# Altium PCB Fast_Servo.PCBDOC (part 9 of 11)
Units mm, origin at the board's own origin, x right, y up, seen from the top; angles counter-clockwise.
Board outline 162.48 x 100 mm, 6 copper layers (Top, GP1(GND), L3, L4, P3V3, Bot), stack 1.716 mm thick; 668 components, 491 nets, 2308 pads, 1133 vias.
Unrouted connection lines stored in the file: 2.
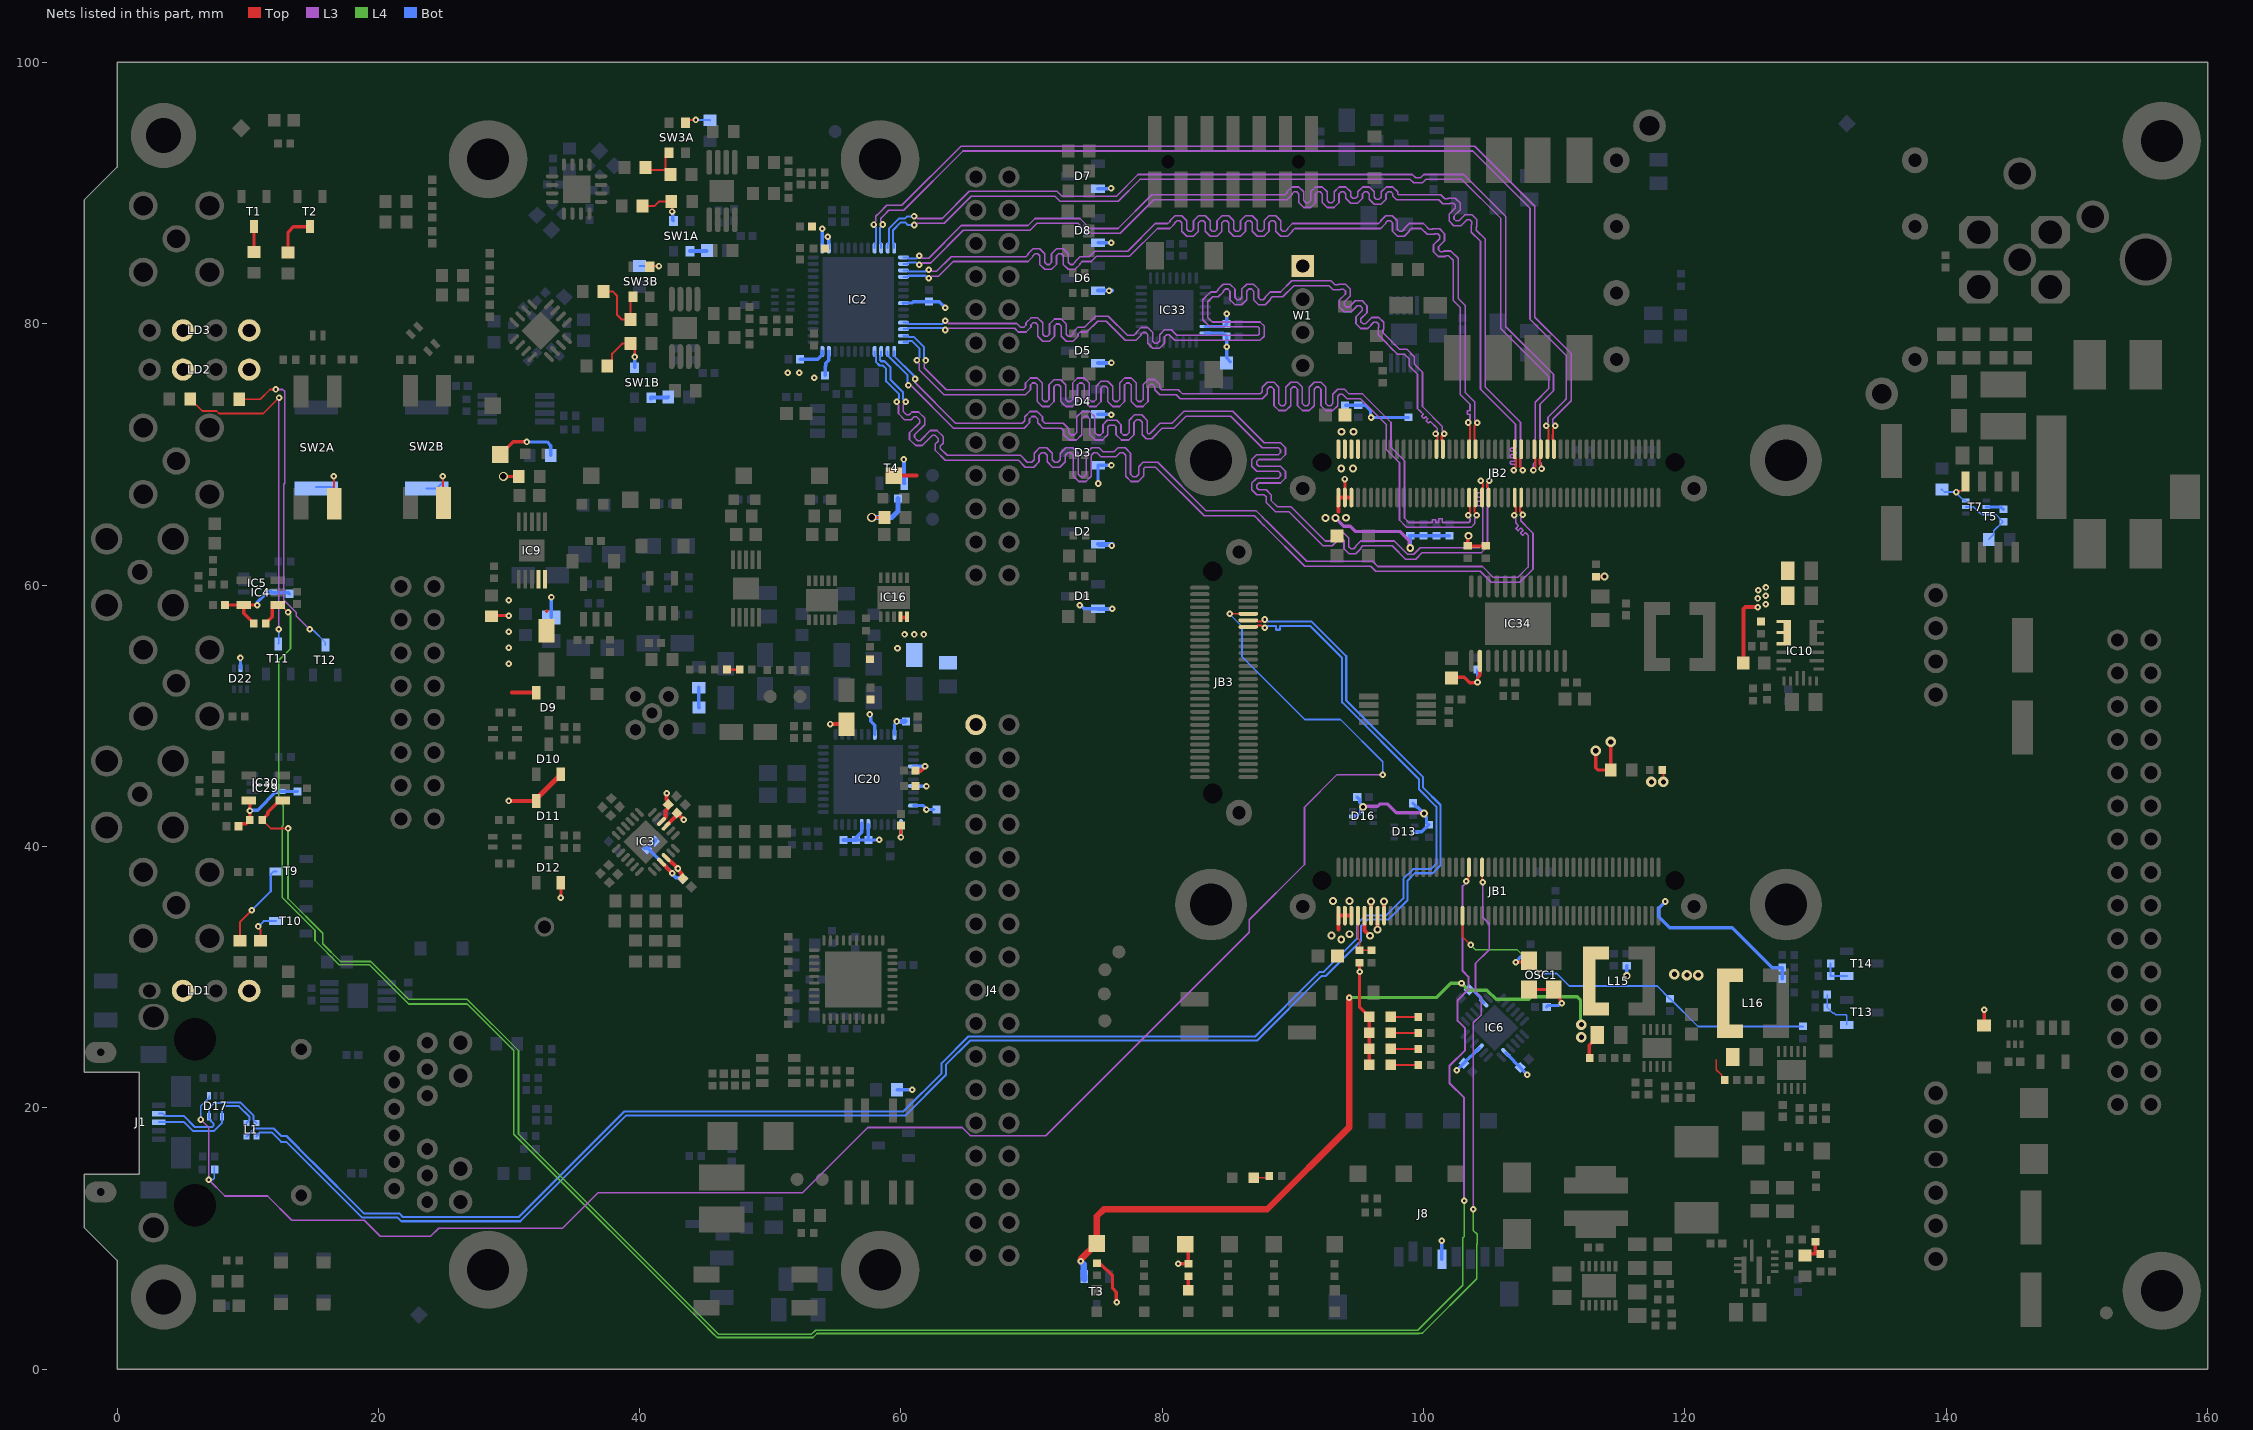
[diagram p11: the nets of this part, all layers, seen from the top]

## Via types
v1: diameter 0.5, hole 0.2, Top to Bot, tented both sides, 1045 vias
v2: diameter 0.8, hole 0.4, Top to Bot, tented both sides, 40 vias
v3: diameter 0.6, hole 0.3, Top to Bot, tented both sides, 27 vias
v4: diameter 1.27, hole 0.711, Top to Bot, tented both sides, 11 vias
v5: diameter 0.7, hole 0.5, Top to Bot, tented both sides, 10 vias

## Nets (pads, with @x,y where several pads share a name; then routed paths per layer and width w, separated by ;. In a path a pad name is that pad's centre, name@x,y a point inside that pad or via, vN(x,y) a via of type N, cw(c..) or ccw(c..) an arc to the next point about the centre after c; other vN are vias at no path point) (continued)
NetLD15_2: LD15.2 R115.2 | length 1.1
  Top w0.25: LD15.2@81.994,6.024 R115.2@81.994,7.122
NetLD16_1: LD16.1 R158.1 | length 2.1
  Top w0.125: LD16.1@97.49,23.276 R158.1@99.595,23.276
NetLD17_1: LD17.1 R159.1 | length 2.1
  Top w0.125: LD17.1@97.494,24.5 R159.1@99.591,24.5
NetLD18_1: LD18.1 R161.1 | length 2.1
  Top w0.125: LD18.1@97.498,25.724 R161.1@99.587,25.724
NetLD19_1: LD19.1 R162.1 | length 2.1
  Top w0.125: LD19.1@97.503,26.948 R162.1@99.582,26.948
NetLD20_2: LD20.2 R133.2 | length 1.2
  Top w0.125: LD20.2@87.007,14.656 88.062,14.656 R133.2@88.189,14.783
NetOSC1_3: OSC1.3 R160.1 | length 2.4
  Top w0.254: v1(107.041,31.152) 107.966,31.152 OSC1.3@108.07,31.256
  Bot w0.254: v1(107.041,31.152) 107.476,31.587 R160.1@108.175,31.587
NetR40A_2: R40A.2 SW1A.1 | length 1.3
  Bot w0.3: SW1A.1@43.862,85.567 R40A.2@45.12,85.567
NetR40B_2: R40B.2 SW1B.1 | length 1.4
  Bot w0.3: SW1B.1@40.884,74.297 SW1B.1@40.884,74.347 42.142,74.347 R40B.2@42.186,74.391
NetR45A_2: R45A.2 R46A.1 SW1A.3 | length 3.9
  Top w0.16: R45A.2@40.223,89.025 41.148,89.025 41.498,89.375 R46A.1@42.424,89.375 42.479,89.319 v1(42.479,88.591)
  Bot w0.25: v1(42.479,88.591) 42.527,88.544 42.527,87.932 SW1A.3@42.592,87.867
NetR45B_2: R45B.2 R46B.1 SW1B.3 | length 4.8
  Top w0.16: R45B.2@37.527,76.777 37.897,77.147 37.897,77.717 38.66,78.48 R46B.1@39.3,78.48 39.627,78.153 v1(39.627,77.463)
  Bot w0.25: SW1B.3@39.614,76.647 39.621,76.653 39.621,77.457 v1(39.627,77.463)
NetR50A_2: R50A.2 R51A.1 SW3A.3 | length 4.1
  Top w0.16: R50A.2@40.45,91.975 40.669,91.756 R51A.1@42.019,91.756 ; SW3A.3@42.239,93.075 41.993,92.829 41.993,91.782 R51A.1@42.019,91.756 ; R51A.1@42.019,91.756 R51A.1@42.363,91.412 R51A.1@42.019,91.756
NetR50B_2: R50B.2 R51B.1 SW3B.3 | length 5.6
  Top w0.16: R50B.2@37.24,82.48 37.93,82.48 38.27,82.14 38.27,80.68 38.61,80.34 R51B.1@39.3,80.34 39.3,81.86 SW3B.3@39.504,82.064
NetR54A_2: R54A.2 SW2A.4 | length 4.3
  Top w0.16: v1(16.6,68.32) 16.6,66.257 SW2A.4@16.626,66.231
  Bot w0.152: R54A.2@15.245,67.5 16.6,67.5 v1(16.6,68.32)
NetR54B_2: R54B.2 SW2B.4 | length 3.9
  Top w0.16: v1(24.931,68.32) 24.951,68.3 SW2B.4@24.951,66.34
  Bot w0.152: R54B.2@23.7,67.4 24.476,67.4 24.931,67.855 v1(24.931,68.32)
NetR58A_2: R58A.2 SW3A.1 | length 2
  Top w0.16: SW3A.1@43.509,95.375 43.734,95.6 v1(44.288,95.6)
  Bot w0.16: v1(44.288,95.6) 45.349,95.6 R58A.2@45.374,95.575
NetR58B_2: R58B.2 SW3B.1 | length 2.2
  Top w0.16: SW3B.1@40.774,84.364 40.829,84.42 v1(41.477,84.42)
  Bot w0.16: R58B.2@40,84.42 v1(41.477,84.42)
NetR96_2: R96.2 T9.3 | length 6.6
  Top w0.16: R96.2@9.425,32.775 9.425,34.225 v1(10.325,35.125)
  Bot w0.16: v1(10.325,35.125) 11.765,36.565 11.765,37.872 11.985,38.092 T9.3@12.185,38.092
NetR97_2: R97.2 T10.3 | length 2.7
  Top w0.16: v1(10.81,33.875) 10.81,33.783 10.97,33.623 R97.2@10.97,32.775
  Bot w0.16: v1(10.81,33.875) 11.219,34.284 T10.3@12.15,34.284
NetR98_2: R98.2 T11.3 | length 26.7
  Top w0.125: R98.2@5.6,74.261 5.6,74.211 5.987,73.824 6.037,73.824 6.532,73.33 7.614,73.33 7.804,73.14 11.19,73.14 v1(12.4,74.35)
  L3 w0.125: v1(12.378,56.618) 12.378,74.328 v1(12.4,74.35)
  Bot w0.125: T11.3@12.346,55.503 12.378,55.535 v1(12.378,56.618)
NetR99_2: R99.2 T12.3 | length 24.7
  Top w0.125: R99.2@9.35,74.225 10.97,74.225 11.713,74.968 12.143,74.968 v1(12.15,74.975)
  L3 w0.125: v1(12.15,74.975) 12.689,74.975 12.838,74.827 12.838,67.788 12.762,67.713 12.762,58.862 13.714,57.91 13.714,57.642 v1(14.737,56.618)
  Bot w0.125: v1(14.737,56.618) 14.809,56.547 15.016,56.547 15.95,55.612 T12.3@15.95,55.412
NetR101_2: R101.2 T1.3 | length 1.9
  Top w0.25: T1.3@10.488,87.431 10.488,85.509 R101.2@10.498,85.499
NetR103_2: R103.2 T2.3 | length 3.4
  Top w0.25: R103.2@13.091,85.455 13.091,87.022 13.499,87.431 T2.3@14.775,87.431
NetR123_1: R123.1 R192.2 T13.1 | length 3.4
  Bot w0.125: R192.2@130.904,28.658 R123.1@130.904,27.689 130.904,27.669 131.352,27.221 131.445,27.221 131.548,27.118 132.312,27.118 132.385,27.044 T13.1@132.385,26.343
NetR124_1: R124.1 R211.2 T14.1 | length 2.2
  Bot w0.152: R211.2@131.155,31.031 R124.1@131.155,30.081 T14.1@132.385,30.081
NetR141_2: R141.2 R207.1 R208.2 | length 2.2
  Top w0.25: R208.2@129.179,8.7 129.316,8.837 129.982,8.837 ; R207.1@130.007,9.755 129.982,9.73 129.982,8.837 ; R141.2@130.345,8.817 130.325,8.837 129.982,8.837
NetR151_1: R151.1 T7.2 | length 1.4
  Bot w0.25: T7.2@143.065,65.975 144.167,65.975 144.347,65.795 R151.1@144.367,65.795
NetR151_2: R151.2 R154.2 T7.3 T7.5 | length 5.2
  Bot w0.127: T7.5@141.485,65.975 142.095,65.975 142.59,65.48 143.06,65.48 T7.3@143.065,65.475 143.727,65.475 R151.2@144.347,64.855 ; R154.2@143.257,63.5 143.643,63.887 143.643,64.151 R151.2@144.347,64.855 ; R151.2@144.367,64.855 R151.2@144.347,64.855
NetR153_2: R153.2 T5.4 T7.6 | length 3.6
  Top w0.127: v1(140.75,67.125) 140.851,67.125 140.939,67.214 141.229,67.214 141.465,67.45 T5.4@141.465,67.925
  Bot w0.127: R153.2@139.622,67.32 R153.2@139.672,67.32 139.867,67.125 v1(140.75,67.125) 140.75,67.075 141.35,66.475 T7.6@141.485,66.475
NetR171_2: R171.2 R191.1 | length 1.5
  Bot w0.3: R171.2@44.52,52.153 44.52,50.653 R191.1@44.532,50.642
NetR213_2: R213.2 R214.1 | length 1
  Top w0.2: R213.2@46.682,53.527 R214.1@47.647,53.527
NOSEQ: JB1.8 R155.1 R156.2 | length 3.6
  Top w0.125: JB1.8@94.975,34.704 94.975,32.977 95.1,32.851 R155.1@95.1,32.042 96.013,32.042 R156.2@96.02,32.049
OEn_DO0: IC29.1 JB1.41 R90.1 | length 153.4
  Top w0.127: R90.1@11.115,42.025 11.115,42.005 11.341,41.779 11.361,41.779 11.765,41.375 v1(13.09,41.375)
  Top w0.16: v1(103.276,37.345) 103.276,37.393 103.448,37.565 103.448,38.377 JB1.41@103.475,38.404
  Top w0.254: R90.1@11.115,42.025 11.115,42.045 11.546,42.476 11.546,42.621 12.445,43.52 IC29.1@12.695,43.52
  L3 w0.16: v1(103.1,12.875) 103.1,20.765 101.969,21.896 101.969,23.194 103.175,24.4 103.175,26.075 102.6,26.65 102.6,28.227 103.423,29.05 103.423,30.027 102.982,30.468 102.982,36.959 103.276,37.253 v1(103.276,37.345)
  L4 w0.127: v1(13.09,41.375) 13.09,36.01 15.75,33.35 15.75,32.55 17.1,31.2 19.425,31.2 22.31,28.315 26.791,28.315 30.729,24.377 30.729,17.971 46.036,2.664 53.158,2.664 53.472,2.978 99.553,2.978 103,6.425 103,10.05 103.1,10.15 v1(103.1,12.875)
OEn_DO1: IC4.1 JB1.45 R84.1 | length 169.6
  Top w0.125: IC4.1@12.298,58.475 12.548,58.475 13.09,57.933 v1(13.09,57.916) ; JB1.45@104.475,38.404 104.5,38.379 104.5,37.275 v1(104.525,37.25)
  Top w0.254: R84.1@11.395,57.075 11.395,57.095 11.875,57.575 11.875,58.302 12.048,58.475 IC4.1@12.298,58.475
  L3 w0.125: v1(103.805,12.226) 103.805,26.498 104.4,27.093 104.4,28.435 103.975,28.86 103.975,31.05 105.025,32.1 105.025,34.075 104.525,34.575 v1(104.525,37.25)
  L4 w0.125: v1(13.09,57.916) 13.275,57.731 13.275,55.137 12.378,54.24 12.378,43.475 12.736,43.117 12.736,41.639 12.653,41.556 12.653,36.093 15.15,33.595 15.15,32.795 16.996,30.949 19.321,30.949 22.327,27.943 26.808,27.943 30.375,24.376 30.375,17.97 45.037,3.308 45.367,2.978 45.6,2.746 45.932,2.413 53.262,2.413 53.576,2.727 99.648,2.727 ccw(c99.648,2.852) 99.666,2.728 99.914,2.764 104.075,6.925 104.075,9.575 104.096,9.596 104.096,10.318 103.805,10.608 v1(103.805,12.226)
OTG-D_L_N: D17.6 J1.2 L1.4 | length 10.8
  Bot w0.152: J1.2@3.2,19.546 3.525,19.546 3.694,19.376 5.101,19.376 5.931,18.546 7.306,18.546 7.395,18.635 7.395,18.761 7.198,18.958 7.198,19.045 7.051,19.192 7.051,20.013 7.392,20.354 7.95,20.354 8.015,20.419 9.446,20.419 10.441,19.424 10.441,19.069 L1.4@10.665,18.845
OTG-D_L_P: D17.4 J1.3 L1.1 | length 9.6
  Bot w0.152: J1.3@3.2,18.895 5.141,18.895 5.802,18.234 7.435,18.234 8.051,18.85 8.051,20.028 8.14,20.117 9.32,20.117 10.139,19.298 10.139,19.069 L1.1@9.915,18.845
OTG-D_N: JB3.50 L1.3 | length 134.6
  Top w0.16: JB3.50@86.575,57.305 87.212,57.305 87.302,57.215 87.594,57.215 87.748,57.368 v1(87.84,57.368)
  Bot w0.16: L1.3@10.665,17.795 10.81,17.94 10.81,18.002 10.904,18.095 11.869,18.095 12.573,17.391 12.963,17.391 14.784,15.57 14.791,15.57 18.765,11.596 21.478,11.596 21.76,11.314 30.864,11.314 38.946,19.396 60.319,19.396 63.432,22.508 63.432,23.285 65.282,25.135 87.25,25.135 92.179,30.064 92.179,30.078 92.493,30.078 95.214,32.8 95.214,33.916 95.702,34.404 97.284,34.404 98.77,35.89 98.77,37.387 99.33,37.947 100.69,37.947 101.295,38.552 101.295,43.173 99.965,44.503 99.965,45.285 94.081,51.169 94.081,54.556 91.432,57.204 v1@87.848,57.204
OTG-D_P: JB3.48 L1.2 | length 134.6
  Top w0.16: JB3.48@86.575,56.805 87.212,56.805 87.302,56.895 87.594,56.895
  Bot w0.16: L1.2@9.915,17.795 10.535,18.415 12.001,18.415 12.577,17.839 12.967,17.839 14.916,15.89 14.924,15.89 18.897,11.916 21.61,11.916 21.893,11.634 30.731,11.634 38.813,19.716 60.187,19.716 63.112,22.641 63.112,23.418 65.149,25.455 87.117,25.455 91.834,30.172 91.834,30.186 92.046,30.398 92.36,30.398 94.894,32.932 94.894,34.049 95.57,34.724 97.152,34.724 98.45,36.022 98.45,37.52 99.198,38.267 100.557,38.267 100.975,38.685 100.975,43.04 99.645,44.37 99.645,45.153 93.761,51.036 93.761,54.423 91.3,56.884 89.15,56.884 89.064,56.884 ccw(c89.064,56.836) 89.016,56.836 89.016,56.632 cw(c88.968,56.632) 88.968,56.584 88.744,56.584 cw(c88.744,56.632) 88.696,56.632 88.696,56.836 ccw(c88.648,56.836) 88.648,56.884 88.376,56.884 88.216,56.884 v1@87.848,56.884
  other v1: 87.84,56.741
OTG-ID: D17.1 JB3.52 R4.1 | length 138.4
  Top w0.125: v1(85.177,57.8) 85.179,57.802 86.572,57.802 JB3.52@86.575,57.805 JB3.52@86.598,57.828
  L3 w0.125: v1(6.412,19.101) 7.028,18.485 v1(7.028,14.487) 8.27,13.246 11.515,13.246 13.375,11.386 18.916,11.386 20.141,10.16 23.988,10.16 24.615,10.787 34.101,10.787 36.808,13.495 52.467,13.495 57.459,18.487 64.687,18.487 65.321,17.853 71.087,17.853 86.662,33.428 86.662,34.397 90.88,38.615 90.88,43.006 93.375,45.5 v1(96.869,45.5)
  Bot w0.125: v1(6.412,19.101) 6.412,20.133 7.051,20.772 D17.1@7.051,20.907 ; v1(7.028,14.487) 7.324,14.487 7.445,14.608 R4.1@7.445,15.5 ; v1@85.143,57.785 86.097,56.832 86.097,54.519 90.9,49.716 93.631,49.716 96.869,46.479 v1(96.869,45.5)
OUT1A_N: IC2.43 JB2.56 | length 78.5
  Top w0.16: v1(106.923,65.355) 106.923,65.45 107.069,65.595 107.069,65.97 106.975,66.064 JB2.56@106.975,66.704
  L3 w0.125: v1(60.375,74.025) 60.375,73.991 60.184,73.799 60.184,73.285 60.427,73.041 60.626,73.041 60.838,73.253 61.347,73.253 61.81,72.79 61.81,72.281 61.032,71.503 61.032,71.305 61.276,71.061 61.474,71.061 62.252,71.839 62.761,71.839 63.224,71.376 63.224,70.867 63.012,70.655 63.012,70.456 63.538,69.93 69.148,69.93 69.675,69.404 70.002,69.404 70.193,69.594 70.193,70.094 70.602,70.504 71.158,70.504 71.568,70.094 71.568,69.594 71.758,69.404 72.002,69.404 72.193,69.594 72.193,70.094 72.602,70.504 73.158,70.504 73.568,70.094 73.568,68.494 73.758,68.304 74.002,68.304 74.193,68.494 74.193,70.094 74.602,70.504 75.158,70.504 75.458,70.204 76.302,70.204 76.602,70.504 77.158,70.504 77.568,70.094 77.568,68.494 77.758,68.304 78.002,68.304 78.193,68.494 78.193,69.07 78.527,69.404 79.642,69.404 83.368,65.679 87.204,65.679 87.674,65.209 87.674,65.193 87.93,64.937 87.946,64.937 91.06,61.823 96.104,61.823 96.497,61.43 104.5,61.43 105.339,60.591 107.206,60.591 107.995,61.38 107.995,63.817 107.883,63.929 107.821,63.991 ccw(c107.795,63.964) 107.768,63.991 107.609,63.832 cw(c107.582,63.858) 107.556,63.832 107.432,63.955 cw(c107.459,63.982) 107.432,64.008 107.591,64.167 ccw(c107.565,64.194) 107.591,64.22 107.468,64.344 ccw(c107.441,64.318) 107.415,64.344 107.255,64.185 cw(c107.229,64.212) 107.202,64.185 107.079,64.309 cw(c107.105,64.335) 107.079,64.362 107.243,64.527 ccw(c107.223,64.548) 107.243,64.568 107.049,64.763 107.049,65.229 v1(106.923,65.355)
  Bot w0.16: IC2.43@58.484,77.888 58.484,77.576 58.394,77.486 58.394,77.227 58.488,77.133 58.74,77.133 59.184,76.689 59.184,75.739 60.156,74.766 60.156,74.27 60.375,74.051 v1(60.375,74.025)
OUT1A_P: IC2.44 JB2.58 | length 78.7
  Top w0.16: JB2.58@107.475,66.704 107.475,66.064 107.381,65.97 107.381,65.675 107.6,65.456 v1(107.6,65.375)
  L3 w0.125: v1(59.684,74.026) 59.684,73.924 59.809,73.799 59.809,73.129 60.272,72.666 60.781,72.666 60.993,72.878 61.191,72.878 61.435,72.634 61.435,72.436 60.657,71.658 60.657,71.149 61.121,70.686 61.629,70.686 62.407,71.464 62.605,71.464 62.849,71.22 62.849,71.022 62.637,70.81 62.637,70.301 63.383,69.555 68.993,69.555 69.52,69.029 70.158,69.029 70.568,69.439 70.568,69.939 70.758,70.129 71.002,70.129 71.193,69.939 71.193,69.439 71.602,69.029 72.158,69.029 72.568,69.439 72.568,69.939 72.758,70.129 73.002,70.129 73.193,69.939 73.193,68.339 73.602,67.929 74.158,67.929 74.568,68.339 74.568,69.939 74.758,70.129 75.002,70.129 75.302,69.829 76.458,69.829 76.758,70.129 77.002,70.129 77.193,69.939 77.193,68.339 77.602,67.929 78.158,67.929 78.568,68.339 78.568,68.914 78.682,69.029 79.487,69.029 83.212,65.304 87.049,65.304 87.299,65.054 87.299,65.038 87.775,64.562 87.79,64.562 90.905,61.448 95.949,61.448 96.342,61.055 104.344,61.055 105.183,60.216 107.361,60.216 108.37,61.225 108.37,63.972 108.148,64.194 107.424,64.918 107.424,65.128 107.6,65.304 v1(107.6,65.375)
  Bot w0.16: IC2.44@57.984,77.888 57.984,77.576 58.074,77.486 58.074,77.094 58.355,76.813 58.607,76.813 58.864,76.557 58.864,75.606 59.836,74.634 59.836,74.27 59.684,74.118 v1(59.684,74.026)
OUT1B_N: IC2.41 JB2.46 | length 80.9
  Top w0.16: v1(104.38,67.978) 104.38,67.886 104.54,67.726 104.54,67.468 104.502,67.429 104.502,66.731 JB2.46@104.475,66.704
  L3 w0.125: v1(61.075,75.775) 61.075,75.667 61.087,75.654 61.087,75.478 64.18,72.385 69.271,72.385 69.461,72.575 69.461,72.875 69.871,73.285 70.427,73.285 70.836,72.875 70.836,72.575 71.027,72.385 72.427,72.385 72.836,71.975 72.836,71.675 73.027,71.485 73.271,71.485 73.461,71.675 73.461,72.875 73.871,73.285 74.427,73.285 74.836,72.875 74.836,71.675 75.027,71.485 75.271,71.485 75.461,71.675 75.461,72.275 75.794,72.608 76.504,72.608 76.837,72.275 76.837,71.675 77.027,71.485 77.271,71.485 77.461,71.675 77.461,72.63 77.871,73.04 78.427,73.04 78.837,72.63 78.837,71.675 78.926,71.586 79.03,71.586 79.829,72.385 80.74,72.385 81.66,73.305 85.391,73.305 87.806,70.89 89.045,70.89 89.425,70.51 89.425,69.995 89.045,69.615 87.385,69.615 87.225,69.455 87.225,69.25 87.385,69.09 89.045,69.09 89.425,68.71 89.425,68.195 89.045,67.815 87.385,67.815 87.225,67.655 87.225,67.45 87.385,67.29 87.945,67.29 88.325,66.91 88.325,66.48 88.813,65.992 89.847,65.992 92.46,63.38 92.846,63.38 93.006,63.54 93.006,63.6 93.386,63.98 93.902,63.98 94.281,63.6 94.281,62.94 94.442,62.78 94.646,62.78 94.806,62.94 94.806,63 95.186,63.38 97.756,63.38 98.773,62.362 99.243,62.362 99.747,62.866 104.281,62.866 104.515,63.1 104.515,65.893 104.515,65.925 104.515,65.99 104.418,66.088 104.148,66.088 104.051,66.185 104.051,66.315 104.148,66.413 104.418,66.413 104.515,66.51 104.515,66.64 104.418,66.738 104.148,66.738 104.051,66.835 104.051,66.965 104.148,67.063 104.418,67.063 104.515,67.16 104.515,67.35 104.515,67.742 104.38,67.877 v1(104.38,67.978)
  Bot w0.16: IC2.41@59.484,77.888 59.484,77.576 59.46,77.552 60.967,76.045 60.967,75.883 v1(61.075,75.775)
OUT1B_P: IC2.42 JB2.48 | length 80.9
  Top w0.16: JB2.48@104.975,66.704 104.975,67.342 104.86,67.457 104.86,67.718 105.025,67.883 v1(105.025,67.975)
  L3 w0.125: v1(60.574,75.284) 60.645,75.213 60.822,75.213 64.024,72.01 69.427,72.01 69.836,72.42 69.836,72.72 70.027,72.91 70.271,72.91 70.461,72.72 70.461,72.42 70.871,72.01 72.271,72.01 72.461,71.82 72.461,71.52 72.871,71.11 73.427,71.11 73.836,71.52 73.836,72.72 74.027,72.91 74.271,72.91 74.461,72.72 74.461,71.52 74.871,71.11 75.427,71.11 75.836,71.52 75.836,72.12 75.949,72.233 76.349,72.233 76.461,72.12 76.461,71.52 76.871,71.11 77.427,71.11 77.837,71.52 77.837,72.474 78.027,72.665 78.271,72.665 78.462,72.474 78.462,71.52 78.771,71.211 79.185,71.211 79.984,72.01 80.896,72.01 81.816,72.93 85.236,72.93 87.651,70.515 88.4,70.515 88.89,70.515 89.05,70.355 89.05,70.15 88.89,69.99 87.23,69.99 86.85,69.61 86.85,69.095 87.23,68.715 88.89,68.715 89.05,68.555 89.05,68.35 88.89,68.19 87.23,68.19 86.85,67.81 86.85,67.295 87.23,66.915 87.79,66.915 87.95,66.755 87.95,66.325 88.658,65.617 89.692,65.617 89.714,65.595 92.305,63.005 93.002,63.004 93.381,63.384 93.381,63.444 93.542,63.604 93.746,63.604 93.906,63.444 93.906,62.784 94.286,62.405 94.802,62.405 95.181,62.784 95.181,62.844 95.342,63.004 97.601,63.005 98.618,61.987 99.398,61.987 99.902,62.491 104.436,62.491 104.89,62.945 104.89,65.893 104.89,67.739 105.025,67.874 v1(105.025,67.975)
  Bot w0.16: IC2.42@58.984,77.888 58.984,77.576 60.509,76.051 60.509,75.349 v1(60.574,75.284)
OUT1C_N: IC2.39 JB2.42 | length 81
  Top w0.16: v1(103.423,65.355) 103.423,65.447 103.565,65.589 103.565,65.976 103.475,66.066 JB2.42@103.475,66.704
  L3 w0.125: v1(61.902,77.194) 61.902,77.093 61.777,76.968 61.777,76.626 63.454,74.949 69.374,74.949 69.534,75.109 69.534,75.469 69.914,75.849 70.429,75.849 70.809,75.469 70.809,74.209 70.969,74.049 71.174,74.049 71.334,74.209 71.334,75.34 71.714,75.719 72.229,75.719 72.609,75.34 72.609,74.209 72.769,74.049 72.974,74.049 73.134,74.209 73.134,75.469 73.514,75.849 74.029,75.849 74.409,75.469 74.409,74.209 74.569,74.049 74.774,74.049 74.934,74.209 74.934,75.214 75.314,75.593 75.829,75.593 76.209,75.214 76.209,74.209 76.369,74.049 76.574,74.049 76.734,74.209 76.734,75.469 77.114,75.849 77.629,75.849 78.009,75.469 78.009,74.209 78.169,74.049 78.374,74.049 78.534,74.209 78.534,75.355 78.914,75.735 79.429,75.735 79.809,75.355 79.809,75.109 79.969,74.949 81.226,74.949 81.54,74.635 87.488,74.635 87.648,74.795 87.648,75.155 88.028,75.535 88.543,75.535 88.923,75.155 88.923,73.895 89.083,73.735 89.288,73.735 89.448,73.895 89.448,75.155 89.828,75.535 90.343,75.535 90.723,75.155 90.723,73.895 90.883,73.735 91.088,73.735 91.248,73.895 91.248,75.155 91.628,75.535 92.143,75.535 92.523,75.155 92.523,73.895 92.683,73.735 92.888,73.735 93.048,73.895 93.048,74.607 93.428,74.987 93.943,74.987 94.295,74.635 95.317,74.635 97.504,72.448 97.504,70.542 98.532,69.514 98.532,65.132 98.872,64.793 100.543,64.793 100.63,64.793 ccw(c100.63,64.83) 100.668,64.83 100.668,64.962 cw(c100.705,64.962) 100.705,65 100.88,65 cw(c100.88,64.962) 100.918,64.962 100.918,64.83 ccw(c100.955,64.83) 100.955,64.793 101.13,64.793 ccw(c101.13,64.83) 101.168,64.83 101.168,65.055 cw(c101.205,65.055) 101.205,65.093 101.38,65.093 cw(c101.38,65.055) 101.418,65.055 101.418,64.83 ccw(c101.455,64.83) 101.455,64.793 101.668,64.793 101.739,64.793 103.476,64.793 103.549,64.866 103.549,65.128 103.423,65.254 v1(103.423,65.355)
  Bot w0.16: IC2.39@60.184,79.088 60.497,79.088 60.587,78.999 60.981,78.999 61.749,78.231 61.749,77.439 61.902,77.286 v1(61.902,77.194)
OUT1C_P: IC2.40 JB2.44 | length 80.9
  Top w0.16: JB2.44@103.975,66.704 103.975,66.066 103.885,65.976 103.885,65.613 104.05,65.447 v1(104.05,65.355)
  L3 w0.125: v1(61.225,77.2) 61.225,77.145 61.402,76.968 61.402,76.47 63.298,74.574 69.529,74.574 69.909,74.954 69.909,75.314 70.069,75.474 70.274,75.474 70.434,75.314 70.434,74.054 70.814,73.674 71.329,73.674 71.709,74.054 71.709,75.184 71.869,75.344 72.074,75.344 72.234,75.184 72.234,74.054 72.614,73.674 73.129,73.674 73.509,74.054 73.509,75.314 73.669,75.474 73.874,75.474 74.034,75.314 74.034,74.054 74.414,73.674 74.929,73.674 75.309,74.054 75.309,75.058 75.469,75.218 75.674,75.218 75.834,75.058 75.834,74.054 76.214,73.674 76.729,73.674 77.109,74.054 77.109,75.314 77.269,75.474 77.474,75.474 77.634,75.314 77.634,74.054 78.014,73.674 78.529,73.674 78.909,74.054 78.909,75.2 79.069,75.36 79.274,75.36 79.434,75.2 79.434,74.954 79.814,74.574 81.071,74.574 81.385,74.26 87.643,74.26 88.023,74.64 88.023,75 88.183,75.16 88.388,75.16 88.548,75 88.548,73.74 88.928,73.36 89.443,73.36 89.823,73.74 89.823,75 89.983,75.16 90.188,75.16 90.348,75 90.348,73.74 90.728,73.36 91.243,73.36 91.623,73.74 91.623,75 91.783,75.16 91.988,75.16 92.148,75 92.148,73.74 92.528,73.36 93.043,73.36 93.423,73.74 93.423,74.452 93.583,74.612 93.788,74.612 94.14,74.26 95.162,74.26 97.129,72.293 97.129,70.387 98.157,69.359 98.157,64.977 98.717,64.418 100.543,64.418 103.631,64.418 103.924,64.711 103.924,65.128 104.05,65.254 v1(104.05,65.355)
  Bot w0.16: IC2.40@60.184,78.589 60.497,78.589 60.587,78.679 60.849,78.679 61.429,78.098 61.429,77.439 61.225,77.235 v1(61.225,77.2)
OUT1D_N: IC2.37 JB2.33 | length 75.7
  Top w0.16: JB2.33@101.475,70.404 101.475,70.995 101.385,71.085 101.385,71.394 101.566,71.575 v1(101.575,71.575) ; JB2.33@101.475,70.3 JB2.33@101.502,70.327
  L3 w0.125: v1(63.4,80.225) 63.428,80.225 63.626,80.026 68.861,80.026 69.137,79.75 69.411,79.75 69.571,79.91 69.571,80.07 69.951,80.45 70.467,80.45 70.846,80.07 70.846,79.21 71.007,79.05 71.211,79.05 71.371,79.21 71.371,79.985 71.751,80.365 72.267,80.365 72.646,79.985 72.646,79.21 72.807,79.05 73.011,79.05 73.171,79.21 73.171,79.37 73.551,79.75 74.068,79.75 74.896,80.578 75.866,80.578 77.331,79.114 77.835,79.114 77.995,79.274 77.995,79.334 78.375,79.714 78.891,79.714 79.27,79.334 79.27,78.674 79.431,78.514 79.635,78.514 79.795,78.674 79.795,79.16 80.175,79.54 80.691,79.54 81.116,79.114 87.328,79.114 87.424,79.21 87.424,79.669 87.327,79.766 83.658,79.766 83.102,80.322 83.102,81.842 83.696,82.436 84.126,82.436 84.287,82.596 84.287,82.656 84.666,83.036 85.182,83.036 85.562,82.656 85.562,81.996 85.722,81.836 85.926,81.836 86.087,81.996 86.087,82.656 86.466,83.036 86.982,83.036 87.362,82.656 87.362,81.996 87.522,81.836 87.726,81.836 87.887,81.996 87.887,82.056 88.266,82.436 89.05,82.436 89.906,83.293 92.917,83.293 93.222,82.987 93.449,82.987 93.491,83.029 94.028,83.029 94.393,82.665 94.393,82.128 93.926,81.661 93.926,81.435 94.071,81.29 94.297,81.29 94.764,81.757 95.301,81.757 95.666,81.392 95.666,80.855 95.199,80.388 95.199,80.162 95.344,80.017 95.57,80.017 96.037,80.484 96.574,80.484 96.938,80.119 96.938,79.582 96.896,79.54 96.896,79.313 97.582,78.627 97.582,78.612 97.839,78.356 97.853,78.356 98.157,78.052 98.722,78.052 99.286,77.488 99.286,76.924 99.91,76.299 99.91,73.666 101.431,72.145 101.431,71.82 101.575,71.676 v1(101.575,71.575)
  Bot w0.16: IC2.37@60.184,80.088 60.497,80.088 60.587,79.998 61.709,79.998 63.156,79.999 63.382,80.225 v1(63.4,80.225)
OUT1D_P: IC2.38 JB2.31 | length 75.7
  Top w0.16: JB2.31@100.948,70.327 JB2.31@100.975,70.3 ; v1@100.948,71.536 v1(100.913,71.571) 100.913,71.546 101.065,71.394 101.065,71.081 100.975,70.991 JB2.31@100.975,70.404
  L3 w0.125: v1(63.4,79.526) 63.501,79.526 63.626,79.651 68.705,79.651 68.981,79.375 69.567,79.375 69.946,79.755 69.946,79.915 70.107,80.075 70.311,80.075 70.471,79.915 70.471,79.055 70.851,78.675 71.367,78.675 71.746,79.055 71.746,79.829 71.907,79.99 72.111,79.99 72.271,79.829 72.271,79.055 72.651,78.675 73.167,78.675 73.546,79.055 73.546,79.215 73.707,79.375 74.223,79.375 75.052,80.203 75.711,80.203 77.175,78.739 77.991,78.739 78.37,79.119 78.37,79.179 78.531,79.339 78.735,79.339 78.895,79.179 78.895,78.519 79.275,78.139 79.791,78.139 80.17,78.519 80.17,79.005 80.331,79.165 80.535,79.165 80.961,78.739 87.483,78.739 87.799,79.055 87.799,79.824 87.483,80.141 83.813,80.141 83.477,80.477 83.477,81.687 83.852,82.061 84.282,82.061 84.662,82.441 84.662,82.501 84.822,82.661 85.026,82.661 85.187,82.501 85.187,81.841 85.566,81.461 86.082,81.461 86.462,81.841 86.462,82.501 86.622,82.661 86.826,82.661 86.987,82.501 86.987,81.841 87.366,81.461 87.882,81.461 88.262,81.841 88.262,81.901 88.422,82.061 89.228,82.061 90.085,82.917 92.762,82.917 93.067,82.612 93.604,82.612 93.647,82.654 93.873,82.654 94.018,82.51 94.018,82.283 93.551,81.817 93.551,81.279 93.916,80.915 94.453,80.915 94.919,81.382 95.146,81.382 95.291,81.237 95.291,81.01 94.824,80.544 94.824,80.007 95.188,79.642 95.726,79.642 96.192,80.109 96.419,80.109 96.563,79.964 96.563,79.738 96.521,79.695 96.521,79.158 97.207,78.472 97.207,78.457 97.683,77.981 97.698,77.981 98.002,77.677 98.539,77.677 98.911,77.306 98.911,76.768 99.535,76.144 99.535,73.511 99.71,73.336 99.799,73.248 99.949,73.097 99.949,73.044 99.861,72.956 99.861,72.903 99.984,72.779 100.037,72.779 100.126,72.868 100.179,72.868 100.303,72.744 100.303,72.691 100.214,72.602 100.214,72.549 100.338,72.426 100.391,72.426 100.479,72.514 100.532,72.514 100.683,72.364 100.852,72.194 101.056,71.99 101.056,71.816 100.913,71.673 v1(100.913,71.571)
  Bot w0.16: IC2.38@60.184,79.589 60.497,79.589 60.587,79.678 61.842,79.678 63.248,79.679 v1(63.4,79.526)
OUT2A_N: IC2.29 JB2.43 | length 75
  Top w0.16: JB2.43@103.975,70.404 103.975,71.042 103.885,71.132 103.885,71.526 103.885,72.202 104.1,72.417 v1(104.1,72.425)
  L3 w0.125: v1(62.125,84.151) 62.226,84.151 62.351,84.026 62.725,84.026 63.839,85.14 69.564,85.14 69.724,85.3 69.724,85.36 70.104,85.74 70.619,85.74 70.999,85.36 70.999,84.7 71.159,84.54 71.364,84.54 71.524,84.7 71.524,85.36 71.904,85.74 72.419,85.74 72.799,85.36 72.799,84.7 72.959,84.54 73.164,84.54 73.324,84.7 73.324,84.76 73.704,85.14 74.41,85.14 74.828,85.558 77.357,85.558 79.471,87.672 80.429,87.672 80.589,87.832 80.589,87.892 80.969,88.272 81.484,88.272 81.864,87.892 81.864,87.232 82.024,87.072 82.229,87.072 82.389,87.232 82.389,87.892 82.769,88.272 83.284,88.272 83.664,87.892 83.664,87.232 83.824,87.072 84.029,87.072 84.189,87.232 84.189,87.892 84.569,88.272 85.084,88.272 85.464,87.892 85.464,87.232 85.624,87.072 85.829,87.072 85.989,87.232 85.989,87.892 86.369,88.272 86.884,88.272 87.264,87.892 87.264,87.232 87.424,87.072 87.629,87.072 87.789,87.232 87.789,87.892 88.169,88.272 88.684,88.272 89.064,87.892 89.064,87.232 89.224,87.072 89.429,87.072 89.589,87.232 89.589,87.292 89.969,87.672 96.554,87.672 96.714,87.832 96.714,87.892 97.094,88.272 97.609,88.272 97.989,87.892 97.989,87.232 98.149,87.072 98.354,87.072 98.514,87.232 98.514,87.292 98.894,87.672 99.984,87.672 100.431,87.224 100.658,87.224 100.7,87.267 101.237,87.267 101.602,86.902 101.602,86.365 101.135,85.898 101.135,85.672 101.28,85.527 101.506,85.527 101.549,85.57 102.086,85.57 102.642,85.013 102.642,81.934 103.175,81.402 103.175,74.74 103.925,73.989 v1@103.925,72.517
  Bot w0.16: IC2.29@60.184,84.089 60.497,84.089 60.587,83.999 61.88,83.999 62.033,84.151 v1(62.125,84.151)
OUT2A_P: IC2.30 JB2.41 | length 74.9
  Top w0.16: v1(103.412,72.447) 103.412,72.355 103.565,72.202 103.565,71.394 103.565,71.132 103.475,71.042 JB2.41@103.475,70.404
  L3 w0.125: v1(62.125,83.475) 62.175,83.475 62.351,83.651 62.881,83.651 63.994,84.765 69.719,84.765 70.099,85.145 70.099,85.205 70.259,85.365 70.464,85.365 70.624,85.205 70.624,84.545 71.004,84.165 71.519,84.165 71.899,84.545 71.899,85.205 72.059,85.365 72.264,85.365 72.424,85.205 72.424,84.545 72.804,84.165 73.319,84.165 73.699,84.545 73.699,84.605 73.859,84.765 74.565,84.765 74.984,85.183 77.513,85.183 79.626,87.297 80.584,87.297 80.964,87.676 80.964,87.736 81.124,87.897 81.329,87.897 81.489,87.736 81.489,87.076 81.869,86.697 82.384,86.697 82.764,87.076 82.764,87.736 82.924,87.897 83.129,87.897 83.289,87.736 83.289,87.076 83.669,86.697 84.184,86.697 84.564,87.076 84.564,87.736 84.724,87.897 84.929,87.897 85.089,87.736 85.089,87.076 85.469,86.697 85.984,86.697 86.364,87.076 86.364,87.736 86.524,87.897 86.729,87.897 86.889,87.736 86.889,87.076 87.269,86.697 87.784,86.697 88.164,87.076 88.164,87.736 88.324,87.897 88.529,87.897 88.689,87.736 88.689,87.076 89.069,86.697 89.584,86.697 89.964,87.076 89.964,87.136 90.124,87.297 96.709,87.297 97.089,87.676 97.089,87.736 97.249,87.897 97.454,87.897 97.614,87.736 97.614,87.076 97.994,86.697 98.509,86.697 98.889,87.076 98.889,87.136 99.049,87.297 99.828,87.297 100.276,86.849 100.813,86.849 100.855,86.892 101.082,86.892 101.227,86.747 101.227,86.52 100.76,86.054 100.76,85.517 101.124,85.152 101.662,85.152 101.704,85.195 101.93,85.195 102.267,84.858 102.267,81.779 102.8,81.246 102.8,74.584 103.55,73.834 103.55,73.711 103.55,73.586 103.55,73.374 cw(c103.513,73.374) 103.513,73.336 103.388,73.336 ccw(c103.388,73.299) 103.35,73.299 103.35,73.124 ccw(c103.388,73.124) 103.388,73.086 103.513,73.086 cw(c103.513,73.049) 103.55,73.049 103.55,72.838 103.55,72.686 103.484,72.62 103.484,72.513 v1@103.55,72.447
  Bot w0.16: IC2.30@60.184,83.589 60.497,83.589 60.587,83.679 61.88,83.679 62.084,83.475 v1(62.125,83.475)
OUT2B_N: IC2.27 JB2.57 | length 78.3
  Top w0.16: JB2.57@107.475,70.404 107.475,69.766 107.385,69.676 107.385,69.294 107.382,69.291 107.382,69.045 107.575,68.852 v1(107.575,68.8)
  L3 w0.125: v1@61.488,85.079 61.573,85.079 61.626,85.026 62.123,85.026 64.621,87.524 69.725,87.524 70.261,88.061 73.701,88.061 74.466,87.297 76.615,87.297 79.194,89.875 89.39,89.875 89.55,90.035 89.55,90.095 89.93,90.475 90.445,90.475 90.825,90.095 90.825,89.435 90.985,89.275 91.19,89.275 91.35,89.435 91.35,90.095 91.73,90.475 92.245,90.475 92.625,90.095 92.625,89.435 92.785,89.275 92.99,89.275 93.15,89.435 93.15,90.095 93.53,90.475 94.045,90.475 94.425,90.095 94.425,89.76 94.585,89.6 94.79,89.6 94.95,89.76 94.95,90.095 95.33,90.475 95.845,90.475 96.225,90.095 96.225,89.679 96.385,89.519 96.59,89.519 96.75,89.679 96.75,90.095 97.13,90.475 97.645,90.475 98.025,90.095 98.025,89.928 98.078,89.875 101.32,89.875 101.624,89.571 101.851,89.571 101.893,89.613 102.43,89.613 102.795,89.249 102.795,88.712 102.328,88.245 102.328,88.019 102.473,87.874 102.699,87.874 103.166,88.341 103.703,88.341 104.067,87.976 104.067,87.439 104.025,87.397 104.025,87.17 104.73,86.465 104.73,75.144 107.41,72.465 107.41,70.948 107.41,69.026 107.575,68.861 v1(107.575,68.8)
  Bot w0.16: IC2.27@60.184,85.089 60.497,85.089 60.587,84.999 61.155,84.999 61.357,85.2 v1(61.4,85.2) 61.4,85.151 v1@61.337,85.089
OUT2B_P: IC2.28 JB2.55 | length 79.4
  Top w0.16: v1(106.91,68.8) 106.91,68.892 107.062,69.045 107.062,69.424 107.065,69.426 107.065,69.676 106.975,69.766 JB2.55@106.975,70.404
  L3 w0.125: v1@61.4,84.686 61.488,84.598 61.573,84.598 61.626,84.651 62.278,84.651 64.777,87.149 69.88,87.149 70.416,87.686 73.546,87.686 74.31,86.922 76.771,86.922 79.349,89.5 89.545,89.5 89.925,89.88 89.925,89.94 90.085,90.1 90.29,90.1 90.45,89.94 90.45,89.28 90.83,88.9 91.345,88.9 91.725,89.28 91.725,89.94 91.885,90.1 92.09,90.1 92.25,89.94 92.25,89.28 92.63,88.9 93.145,88.9 93.525,89.28 93.525,89.94 93.685,90.1 93.89,90.1 94.05,89.94 94.05,89.605 94.43,89.225 94.945,89.225 95.325,89.605 95.325,89.94 95.485,90.1 95.69,90.1 95.85,89.94 95.85,89.523 96.23,89.144 96.745,89.144 97.125,89.523 97.125,89.94 97.285,90.1 97.49,90.1 97.65,89.94 97.65,89.772 97.922,89.5 101.165,89.5 101.469,89.196 102.006,89.196 102.048,89.238 102.275,89.238 102.42,89.094 102.42,88.867 101.953,88.4 101.953,87.863 102.317,87.499 102.855,87.499 103.321,87.966 103.548,87.966 103.692,87.821 103.692,87.594 103.65,87.552 103.65,87.015 104.355,86.309 104.355,74.989 107.035,72.31 107.035,71.066 107.035,70.625 107.035,70.567 106.96,70.492 106.702,70.492 106.627,70.417 106.627,70.317 106.702,70.242 106.96,70.242 107.035,70.167 107.035,70.067 106.96,69.992 106.702,69.992 106.627,69.917 106.627,69.817 106.702,69.742 106.96,69.742 107.035,69.667 107.035,69.567 106.96,69.492 106.702,69.492 106.627,69.417 106.627,69.317 106.702,69.242 106.96,69.242 107.035,69.167 107.035,69.117 107.035,69.026 106.91,68.901 v1(106.91,68.8)
  Bot w0.16: IC2.28@60.184,84.589 60.497,84.589 60.587,84.679 61.155,84.679 61.243,84.591 61.305,84.591 v1@61.306,84.593
  other v1: 61.4,84.526
OUT2C_N: IC2.25 JB2.63 | length 75.3
  Top w0.16: JB2.63@108.975,70.404 108.975,69.766 108.885,69.676 108.885,69.294 108.882,69.291 108.959,69.215 108.959,68.978 v1(109.024,68.913)
  L3 w0.125: v1(61,88.225) 61.07,88.225 61.235,88.061 63.157,88.061 65.232,90.135 71.945,90.135 72.332,89.748 76.466,89.748 78.143,91.425 99.141,91.425 99.394,91.172 99.756,91.172 100.009,91.425 103.08,91.425 106.29,88.215 106.29,79.784 109.94,76.135 109.94,74.87 108.91,73.84 108.91,69.425 108.985,69.35 108.985,68.952 v1(109.024,68.913)
  Bot w0.152: IC2.25@58.984,85.788 58.984,86.103 59.078,86.197 59.078,87.284 59.866,88.073 60.312,88.073 60.464,88.225 v1(61,88.225)
OUT2C_P: IC2.26 JB2.61 | length 74.4
  Top w0.16: v1(108.407,68.799) 108.407,68.889 108.562,69.045 108.562,69.424 108.565,69.426 108.565,69.676 108.475,69.766 JB2.61@108.475,70.404
  L3 w0.125: v1(61.008,87.561) 61.11,87.561 61.235,87.686 63.312,87.686 65.387,89.76 71.789,89.76 72.176,89.373 76.621,89.373 78.298,91.05 98.986,91.05 99.238,90.797 99.912,90.797 100.164,91.05 102.924,91.05 105.915,88.059 105.915,79.629 109.565,75.979 109.565,75.026 108.535,73.996 108.535,70.866 108.535,69.425 108.407,69.297 v1(108.407,68.799)
  Bot w0.152: IC2.26@59.484,85.788 59.484,86.103 59.39,86.197 59.39,87.155 59.996,87.76 60.312,87.76 60.512,87.561 v1(61.008,87.561)
OUT2D_N: IC2.23 JB2.67 | length 77.7
  Top w0.16: JB2.67@109.975,70.404 109.975,71.042 109.885,71.132 109.885,71.502 109.892,71.509 109.892,71.936 110.075,72.119 v1(110.075,72.2)
  L3 w0.125: v1(57.921,87.597) 57.921,87.698 58.073,87.85 58.073,88.225 58.366,88.518 58.372,88.518 58.918,89.064 60.054,89.064 64.588,93.598 103.911,93.598 108.515,88.994 108.515,80.51 111.3,77.724 111.3,74.103 109.89,72.692 109.89,72.43 110.075,72.245 v1(110.075,72.2)
  Bot w0.16: v1(57.921,87.597) 57.921,87.505 58.074,87.352 58.074,86.191 57.984,86.101 IC2.23@57.984,85.788
OUT2D_P: IC2.24 JB2.65 | length 76.5
  Top w0.16: v1(109.39,72.203) 109.39,72.122 109.572,71.939 109.572,71.713 109.565,71.706 109.565,71.132 109.475,71.042 JB2.65@109.475,70.404
  L3 w0.125: v1(58.6,87.6) 58.6,87.701 58.448,87.853 58.448,88.07 58.521,88.143 58.53,88.143 58.747,88.36 58.747,88.363 59.074,88.689 60.209,88.689 64.743,93.223 103.756,93.223 108.14,88.839 108.14,80.354 110.925,77.569 110.925,74.258 110.755,74.088 109.671,73.004 109.515,72.848 109.515,72.43 109.39,72.305 v1(109.39,72.203)
  Bot w0.16: IC2.24@58.484,85.788 58.484,86.101 58.394,86.191 58.394,87.352 58.6,87.558 v1(58.6,87.6)
P1V8: C36.2 C78.2 C106.2 C131.1 IC2.34 IC6.5 JB2.2 JB2.4 JB2.6 L15.2 R68.2 R78.2 R132.2 R152.2 R173.1 R174.1 R177.2 R184.2 R185.2 R209.2 T3.1 TP6.1 | length 91.4
  Top w0.254: JB2.4@93.975,66.704 93.976,66.705 93.976,68.118 v1(93.978,68.12) ; R132.2@112.728,23.803 112.685,23.845 112.685,24.791 113.291,25.398 C106.2@113.291,25.573 ; v2(113.181,47.33) 113.181,46.005 113.33,45.856 R209.2@114.325,45.856 v2(114.325,48)
  Top w0.3: 93.475,65.629 JB2.2@93.475,66.704 JB2.4@93.975,66.704 JB2.6@94.475,66.704
  Top w0.508: v1(73.75,8.25) 73.75,8.382 TP6.1@74.979,9.61 ; TP6.1@74.982,9.753 74.982,11.692 75.527,12.237 88.03,12.237 94.317,18.524 v1(94.317,28.435)
  L3 w0.254: v3@93.275,65.1 93.284,65.1 93.884,64.5 94.4,64.5 94.8,64.1 98.2,64.1 98.909,63.391 98.909,62.916 v3(98.975,62.85)
  L4 w0.254: v1(94.317,28.435) 100.985,28.435 102.083,29.533 v1(102.9,29.533) 103.434,29 104.849,29 105.549,28.3 108.061,28.3 108.266,28.505 111.75,28.505 112.002,28.253 112.002,26.446 v2(112.081,26.367)
  Bot w0.25: R173.1@94.019,73.776 R174.1@95,73.776 95.535,73.776 95.927,73.384 95.927,72.876 v1(95.975,72.828) 95.982,72.836 R177.2@98.85,72.836
  Bot w0.254: IC2.34@60.184,81.589 IC2.34@60.193,81.58 ; IC2.34@60.186,81.586 60.814,81.586 60.922,81.693 C36.2@62.141,81.693 62.927,81.693 v1(63.382,81.238) ; R68.2@98.9,63.75 98.917,63.767 R184.2@101.975,63.767 ; v3(98.975,62.85) R68.2@98.975,63.767 ; v1(102.9,29.533) 102.913,29.533 C78.2@103.458,28.989 ; C78.2@103.493,29.024 103.752,29.024 103.971,28.805 104.001,28.805 104.381,28.425 104.381,28.255 IC6.5@104.602,28.034 ; v3(115.55,30.1) R185.2@115.55,30.862
  Bot w0.508: v1(73.75,8.25) 73.986,8.014 73.986,7.129 T3.1@74.032,7.083 T3.1@74.032,6.883
  other v2: 112.081,25.405
  other v3: 92.496,65.127 93.257,65.127 94.048,65.154
P1V8_SOM_OUT: JB1.40 R137.1 R188.1 | length 30.5
  Top w0.125: JB1.40@102.975,34.704 102.975,33.083 v1(103.597,32.461)
  L4 w0.125: v1(103.597,32.461) 103.952,32.106 107.144,32.106 v1(108.975,30.275)
  Bot w0.125: v1(108.975,30.275) 110.196,30.275 111.153,29.318 117.871,29.318 118.842,28.348 R137.1@118.862,28.348 118.882,28.348 121.007,26.223 R188.1@129.035,26.223
P1V8A: C28.1 C29.1 C30.1 C31.1 C134.2 C135.1 C149.2 C150.2 C151.2 C152.2 C153.2 C154.2 C155.1 C158.2 C159.2 C160.2 IC2.15 IC2.16 IC2.51 IC2.52 IC16.9 IC16.10 IC20.18 IC20.21 IC20.26 IC20.29 IC20.32 IC20.34 IC20.39 IC20.40 R218.2 T4.1 TP11.1 | length 29
  Top w0.25: v1(60,40.692) C154.2@60,41.65 ; v1@61.829,46.135 v1(61.839,46.125)
  Top w0.254: C152.2@60.975,45.8 61.035,45.74 61.504,45.74 61.829,46.066 v1@61.829,46.135
  Top w0.3: v1@54.584,49.377 56.207,49.377 C155.1@56.244,49.34 ; TP11.1@59.943,68.865 TP11.1@59.458,68.38 61.191,68.38 ; IC16.9@59.958,57.522 IC16.10@60.458,57.522 ; v1@60.208,69.562 v1(60.208,69.616)
  Bot w0.25: v1(53.976,87.276) 53.974,87.275 53.974,85.798 IC2.15@53.984,85.788 IC2.16@54.484,85.788 ; IC20.32@60.95,43.125 61.721,43.125 62.021,42.825 C151.2@62.5,42.825
  Bot w0.254: C30.1@52.284,77.286 53.197,77.286 53.644,77.286 53.984,77.626 IC2.52@53.984,77.888 ; C28.1@54.2,76.056 54.2,76.747 54.237,76.784 54.237,76.976 54.475,77.215 54.475,77.88 IC2.51@54.484,77.888 ; v1(54.4,86.675) 54.475,86.6 54.475,85.797 IC2.16@54.484,85.788 ; C149.2@56.401,40.5 C150.2@57.398,40.5 ; IC20.39@57.5,41.675 57.5,40.5 v1(58.35,40.5) ; v1(57.603,50.102) 57.693,50.012 57.693,49.583 58.001,49.275 IC20.18@58,48.575 ; IC20.21@59.5,48.575 59.509,48.584 59.509,49.342 59.666,49.5 v1(59.666,49.566) ; v1(60,40.692) IC20.34@60,41.675 ; IC20.29@60.95,44.625 60.959,44.616 61.93,44.616 v1(61.949,44.597)
  Bot w0.3: C159.2@55.59,40.485 C149.2@56.545,40.484 ; C149.2@56.401,40.5 57,41.099 IC20.40@57,41.675 IC20.40@57,41.775 ; v1(60.208,69.616) 60.231,69.593 60.231,67.819 T4.1@60.255,67.796 ; IC20.26@60.975,46.125 v1(61.839,46.125)
  Bot w0.381: v1(59.666,49.566) 59.671,49.571 60.308,49.571 C153.2@60.32,49.583
  other v1: 61.949,42.825 54.584,49.37 59.733,55.164 60.271,56.224 61.008,56.224 61.745,56.224 53.364,75.883 51.322,76.247 52.222,76.247
P2V5: C107.2 L16.2 R202.2 R210.1 | length 2.7
  Top w0.125: R210.1@118.257,45.856 118.356,45.757 v2@118.356,45.001 ; 122.407,23.668 122.407,22.918 122.816,22.509 122.816,22.342 R202.2@123.04,22.118
  other v2: 120.152,30.158 121.025,30.158 119.199,30.218 117.435,44.939 118.349,44.939
P2V5A: C56.2 C58.2 C60.2 C64.2 C66.2 C68.2 C108.2 C109.1 D9.2 D10.2 D11.2 D12.2 IC3.3 IC3.4 IC3.9 IC3.10 IC9.9 IC9.10 R106.2 R220.2 TP3.1 | length 29.1
  Top w0.254: R220.2@28.677,57.611 28.734,57.669 v1(29.979,57.669) ; TP3.1@29.344,70 30.317,70.973 31.345,70.973 v1(31.361,70.958) ; D11.2@32.026,43.426 D11.2@32.075,43.475 ; D9.2@32.042,51.809 32.061,51.79 D9.2@32.08,51.771 ; 32.895,57.994 32.925,58.024 ; D12.2@33.946,37.196 D12.2@33.96,37.21 ; v1(33.975,36.077) 33.975,37.196 D12.2@33.96,37.21 ; D12.2@33.975,37.225 D12.2@33.96,37.21 ; IC3.3@41.673,38.782 IC3.3@41.673,38.794 ; IC3.4@42.027,39.148 IC3.4@42.039,39.148 ; 42.04,38.396 42.04,38.415 ; v1(42.931,38.311) 42.978,38.264 v1@42.978,38.144 ; C68.2@43.192,37.671 C68.2@43.308,37.554 C68.2@43.272,37.554
  Top w0.3: v1(29.979,43.48) 32.07,43.48 D11.2@32.075,43.475 D11.2@32.105,43.475 ; 30.234,51.79 D9.2@32.061,51.79 ; IC3.3@41.673,38.782 42.04,38.415 ; IC3.10@41.673,41.906 41.673,41.918 41.974,42.219 41.974,42.714 C60.2@42.268,43.008 ; IC3.9@42.027,41.552 42.027,41.564 42.789,42.327 C58.2@42.789,42.486 ; IC3.4@42.039,39.148 42.43,38.757 42.485,38.757 v1(42.931,38.311) ; 42.04,38.396 v1(42.487,37.95) ; v1(42.071,44.064) 42.071,43.577 42.182,43.466 C60.2@42.182,43.207 ; C60.2@42.118,43.158 C60.2@42.125,43.15 ; C58.2@42.788,42.557 42.788,42.488 C58.2@42.789,42.486 ; C58.2@42.857,42.557 42.863,42.557 43.369,42.05 v1(43.375,42.05) ; C58.2@42.869,42.407 C58.2@42.789,42.486 ; v1@42.978,38.144 43.192,37.929 C68.2@43.192,37.671 ; C60.2@42.125,43.15 C60.2@42.268,43.008 ; C60.2@42.125,43.15 C60.2@42.268,43.008
  Top w0.381: D11.2@32.072,43.613 D10.2@33.98,45.521 ; D11.2@32.105,43.475 D11.2@32.134,43.475
  Bot w0.25: v1(31.361,70.958) 32.911,70.958 33.188,70.681
  Bot w0.254: R106.2@33.188,69.931 33.188,70.681 ; C108.2@33.231,57.518 33.231,59.056 v1(33.25,59.075) ; C56.2@40.356,39.853 C56.2@40.615,39.853 ; C64.2@41.234,40.507 41.234,40.489 41.197,40.453 40.615,39.87 C56.2@40.615,39.853 ; v1@42.487,37.901 v1(42.487,37.95) 42.487,37.981 C56.2@40.615,39.853
  Bot w0.3: v1@42.487,37.901 42.782,37.606 43.227,37.606 C66.2@43.329,37.504
  other v1: 29.979,53.979 29.979,55.209 29.979,56.439 29.979,58.843
P3V3: C70.2 C71.2 C73.1 C79.2 C80.2 C88.2 C89.2 C90.2 C93.2 C94.2 C112.2 C128.1 C129.2 C130.1 C189.1 C190.2 C191.2 C199.2 C200.1 D1.2 D2.2 D3.2 D4.2 D5.2 D6.2 D7.2 D8.2 D13.5 D16.5 D22.5 D26.2 IC4.5 IC5.5 IC6.17 IC6.21 IC10.7 IC10.8 IC10.9 IC29.5 IC30.5 IC33.31 IC33.32 IC34.14 J4.34 J8.4 JB1.2 JB1.4 JB1.6 JB1.10 JB1.12 JB1.14 JB1.16 JB2.1 JB2.3 JB2.5 JB2.7 L21.1 L22.1 LD1.2 LD1.4 LD2.2 LD2.4 LD3.2 LD3.4 LD16.2 LD17.2 LD18.2 LD19.2 OSC1.1 OSC1.4 R84.2 R90.2 R104.2 R105.2 R115.1 R120.2 R121.2 R122.2 R135.2 R146.2 R155.2 R157.2 R221.1 R222.1 TP5.1 W1.1 | length 115.7
  Top w0.25: R104.2@75,8.107 75.223,8.107 76.194,7.136 76.194,6.181 76.477,5.898 76.477,5.147 v1(76.522,5.102) ; v1(81.226,8.062) R115.1@81.994,8.062 TP5.1@81.994,9.988 ; TP5.1@81.976,9.813 TP5.1@81.991,9.798 ; R155.2@95.1,31.102 v1(95.1,30.41) 95.1,27.7 LD19.2@95.84,26.96 LD18.2@95.84,25.732 LD17.2@95.84,24.504 95.84,23.26 LD16.2@95.875,23.225
  Top w0.254: C70.2@8.25,58.475 IC4.5@9.698,58.475 ; C71.2@9.29,41.544 9.473,41.727 9.897,41.727 10.175,42.005 R90.2@10.175,42.025 v1(10.175,42.733) 10.175,43.44 IC29.5@10.095,43.52 ; R84.2@10.455,57.075 10.455,57.095 10.292,57.258 10.272,57.258 9.698,57.832 IC4.5@9.698,58.475 ; v1(10.745,58.46) 10.73,58.475 IC4.5@9.698,58.475 ; v5@29.548,68.3 v5(29.568,68.32) L22.1@30.753,68.32 ; v5(57.763,65.18) L21.1@58.739,65.18 ; C93.2@102.125,52.905 102.175,52.955 103.125,52.955 103.541,52.539 104.125,52.539 104.125,52.904 104.3,53.079 IC34.14@104.3,54.205 ; v3(103.423,63.775) 103.38,63.732 R122.2@103.38,62.999 R120.2@104.752,62.999 ; OSC1.4@108.07,29.056 OSC1.1@109.97,29.056 110.443,28.583 v1@110.443,28.197 ; R121.2@113.179,60.652 113.18,60.651 113.849,60.651 v3(113.85,60.65) ; D26.2@142.9,26.3 v1(142.9,27.5)
  Top w0.3: 93.475,33.629 JB1.2@93.475,34.704 JB1.4@93.975,34.704 JB1.6@94.475,34.704 ; JB1.10@95.475,34.704 95.475,33.576 v3(95.887,33.164) ; JB1.12@95.975,34.704 v3(95.975,35.779) ; v3(96.475,33.629) JB1.14@96.475,34.704 ; JB1.16@96.975,34.704 v3(96.975,35.779) ; C200.1@124.473,54.026 124.473,58.162 124.649,58.337 125.543,58.337 v1(125.575,58.305)
  L3 w0.254: v3(95.35,43.019) 95.405,43.074 96.475,43.074 96.644,43.243 97.259,43.243 97.923,42.579 99.982,42.579 v3(100.036,42.524)
  Bot w0.25: J8.4@101.394,8.406 v1@101.394,9.806 ; v1(102.54,22.862) C80.2@103.081,23.401 ; C79.2@107.403,23.081 v1(107.943,22.542)
  Bot w0.254: v1(9.45,54.425) 9.455,54.42 9.455,53.631 D22.5@9.46,53.626 ; v1(10.175,42.733) 10.222,42.78 10.76,42.78 12.195,44.215 IC30.5@12.445,44.215 12.452,44.208 13.793,44.208 C191.2@13.8,44.2 ; v1(10.745,58.46) 10.745,58.684 11.545,59.484 IC5.5@11.795,59.484 11.865,59.414 13.13,59.414 C190.2@13.2,59.344 ; R146.2@59.694,21.38 v1(60.875,21.38) ; v1(73.697,58.455) 73.763,58.455 74.034,58.184 D1.2@75.084,58.184 ; D2.2@75.084,63.134 75.188,63.03 v1(76.134,63.03) ; v1(75.084,67.779) D3.2@75.084,69.169 75.089,69.175 76.104,69.175 v1(76.109,69.18) ; D4.2@75.084,73.075 75.097,73.063 76.091,73.063 v1(76.104,73.05) ; D5.2@75.084,76.984 75.103,77.003 76.09,77.003 v1(76.109,77.022) ; D6.2@75.084,82.534 75.089,82.53 75.92,82.53 v1(75.925,82.525) ; D7.2@75.084,90.335 75.096,90.348 76.064,90.348 v1(76.076,90.36) ; v1(76.09,86.214) 76.076,86.2 75.099,86.2 D8.2@75.084,86.185 76.125,86.185 v1@76.151,86.159 ; IC33.32@83.296,79.293 84.678,79.293 C90.2@84.928,79.043 84.926,79.041 84.926,78.247 v1(84.923,78.244) 84.923,77.389 C89.2@85.208,77.104 ; IC33.31@83.296,79.793 84.728,79.793 C88.2@84.928,79.994 84.928,80.773 v1(84.923,80.778) ; D16.5@94.58,42.297 94.603,42.32 94.894,42.32 95.189,42.615 95.189,42.858 v3(95.35,43.019) 95.35,43.113 95.103,43.36 95.103,43.592 C189.1@94.92,43.775 ; C73.1@99.187,43.308 99.49,43.006 99.566,43.006 100.036,42.535 v3(100.036,42.524) 100.036,42.431 100.217,42.25 100.217,41.819 R157.2@100.38,41.656 ; D13.5@99.322,41.112 99.345,41.135 99.859,41.135 R157.2@100.38,41.656 ; R157.2@100.4,41.656 R157.2@100.38,41.656 ; C80.2@103.081,23.401 IC6.21@104.248,24.569 ; v1(104.125,52.573) C94.2@104.125,53.538 ; IC6.17@106.299,24.216 106.915,23.6 106.915,23.572 C79.2@107.403,23.083 ; C129.2@109.425,27.716 109.541,27.832 110.332,27.832 110.503,28.003 v1(110.57,28.003) ; v1@118.488,35.786 v1(118.496,35.786) 117.987,35.277 117.987,34.631 118.83,33.789 123.615,33.789 126.682,30.721 R222.1@127.437,30.721 R221.1@127.437,29.85
  Bot w0.3: D1.2@75.084,58.184 v1(76.177,58.184) ; D2.2@75.084,63.134 v1@76.177,63.134 ; D4.2@75.084,73.075 v1@76.177,73.075 ; D6.2@75.084,82.534 v1@76.167,82.534 ; D7.2@75.084,90.335 v1@76.133,90.335 ; D5.2@75.087,76.987 v1@76.17,76.987
  Bot w0.381: v5(57.763,65.18) 59.295,65.18 59.775,65.66 R105.2@59.775,66.64
  other v1: 101.381,9.819 126.175,58.522 125.575,58.98 126.175,59.197 125.6,59.605 126.2,59.822
  other v3: 93.694,32.874 92.96,33.191 94.317,33.285 93.063,35.82 94.317,35.82 93.694,68.918 94.602,68.918 93.725,71.741 94.633,71.741